# Altium PCB hub_usb.PcbDoc (part 2 of 2)
Units mm, origin at the board's own origin, x right, y up, seen from the top; angles counter-clockwise.
Board outline 68.09 x 80.66 mm, 4 copper layers (Top Layer 1, Top Layer, Bottom Layer, Bottom Layer 1), stack 0.603 mm thick; 101 components, 78 nets, 533 pads, 44 vias.
Unrouted connection lines stored in the file: 1.
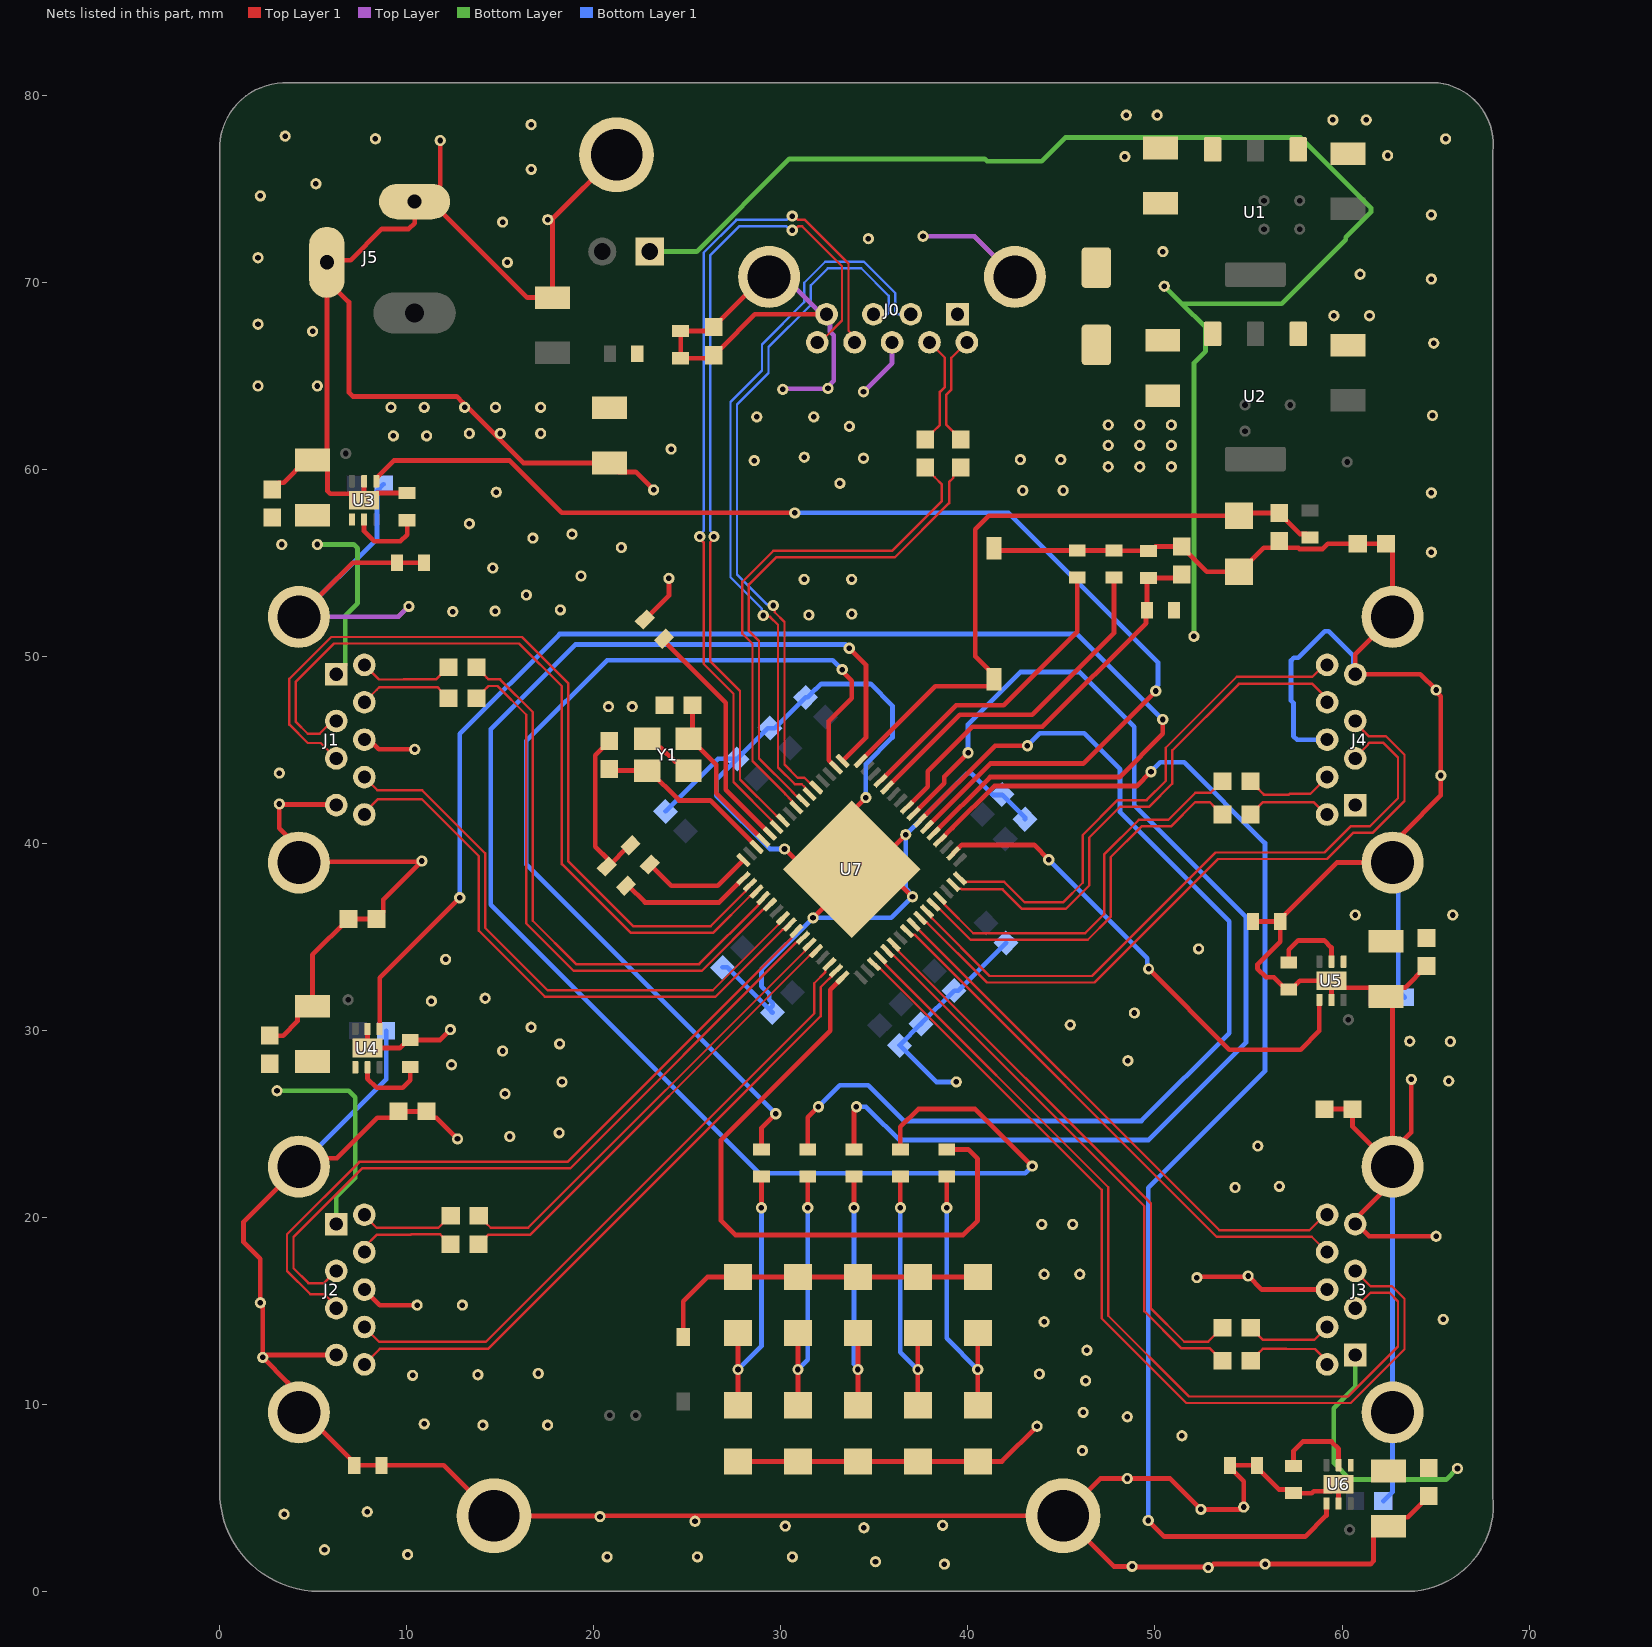
[diagram p4: the nets of this part, all layers, seen from the top]

## Via types
v1: diameter 0.6, hole 0.3, Top Layer 1 to Bottom Layer 1, tented both sides, 44 vias

## Nets (pads, with @x,y where several pads share a name; then routed paths per layer and width w, separated by ;. In a path a pad name is that pad's centre, name@x,y a point inside that pad or via, vN(x,y) a via of type N, cw(c..) or ccw(c..) an arc to the next point about the centre after c; other vN are vias at no path point) (continued)
GND: C1.1 C1.2 C2.1 C3.1 C4.1 C5.1 C6.1 C7.1 C8.1 C9.1 C10.1 C11.1 C12.1 C13.1 C14.2 C15.2 C16.2 C17.2 C18.1 C19.1 C20.1 C21.1 C22.1 C23.1 C24.1 C25.1 C26.1 C27.1 C28.1 C29.1 C30.1 C31.1 C32.1 C35.1 C36.1 C37.1 C42.1 C42.2 C43.1 C43.2 C48.1 C48.2 C49.1 C49.2 D8.1 D9.1 D10.1 D11.1 D12.1 J0.4 J0.7 J0.SH1 J0.SH2 J1.4 J1.7 J1.SH1 J1.SH2 J2.4 J2.7 J2.SH1 J2.SH2 J3.4 J3.7 J3.SH1 J3.SH2 J4.4 J4.7 J4.SH1 J4.SH2 J5.2 J5.3 pad.3@2.038,64.444 pad.3@2.038,67.746 pad.3@2.038,71.302 pad.3@2.165,15.422 pad.3@2.165,74.604 pad.3@2.292,12.501 pad.3@3.181,42.092 pad.3@3.181,43.743 pad.3@3.435,4.119 pad.3@3.493,77.801 pad.3@4.959,67.365 pad.3@5.136,75.255 pad.3@5.213,64.444 pad.3@5.594,2.214 pad.3@7.88,4.246 pad.3@8.316,77.66 pad.3@9.15,63.301 pad.3@9.277,61.777 pad.3@10.039,1.96 pad.3@10.42,45.013 pad.3@10.106,52.655 pad.3@10.307,11.54 pad.3@10.547,15.295 pad.3@10.801,39.044 pad.3@10.928,8.945 pad.3@10.928,63.301 pad.3@11.055,61.777 pad.3@11.309,31.551 pad.3@11.781,77.567 pad.3@12.072,33.781 pad.3@12.325,30.027 pad.3@12.385,28.147 pad.3@12.452,52.379 pad.3@12.706,24.185 pad.3@12.967,15.298 pad.3@13.087,63.301 pad.3@13.341,57.078 pad.3@13.341,61.904 pad.3@13.799,11.574 pad.3@14.065,8.88 pad.3@14.78,58.762 pad.3@14.185,31.707 pad.3@14.593,54.712 pad.3@14.718,52.406 pad.3@14.738,63.301 pad.3@14.992,61.904 pad.3@15.5,24.312 pad.3@15.119,28.884 pad.3@15.119,73.207 pad.3@15.246,26.598 pad.3@15.373,71.048 pad.3@16.389,53.268 pad.3@16.643,30.154 pad.3@16.643,78.414 pad.3@16.651,76.021 pad.3@16.736,56.311 pad.3@17.024,11.64 pad.3@17.151,61.904 pad.3@17.151,63.301 pad.3@17.523,8.88 pad.3@17.532,73.334 pad.3@18.83,56.519 pad.3@18.137,24.508 pad.3@18.167,29.265 pad.3@18.207,52.469 pad.3@18.294,27.233 pad.3@19.31,54.284 pad.3@20.326,3.992 pad.3@20.707,1.833 pad.3@20.779,47.299 pad.3@21.469,55.808 pad.3@22.049,47.299 pad.3@23.192,58.887 pad.3@24.009,54.157 pad.3@24.127,61.068 pad.3@25.406,3.738 pad.3@25.533,1.833 pad.3@28.575,60.452 pad.3@28.708,62.793 pad.3@30.099,64.262 pad.3@30.193,39.687 pad.3@30.232,3.484 pad.3@30.613,1.833 pad.3@31.242,54.102 pad.3@31.248,60.634 pad.3@31.496,52.197 pad.3@31.717,36.004 pad.3@31.756,62.793 pad.3@32.518,64.317 pad.3@33.153,59.237 pad.3@33.661,62.285 pad.3@33.782,54.102 pad.3@33.788,52.252 pad.3@34.54,42.436 pad.3@34.417,60.579 pad.3@34.417,64.135 pad.3@34.435,3.392 pad.3@34.677,72.318 pad.3@35.058,1.579 pad.3@36.67,40.449 pad.3@37.032,37.132 pad.3@37.598,72.445 pad.3@38.647,3.522 pad.3@38.741,1.452 pad.3@39.376,27.233 pad.3@42.805,60.507 pad.3@42.932,58.856 pad.3@43.694,8.818 pad.3@43.821,11.612 pad.3@43.948,19.613 pad.3@44.075,14.406 pad.3@44.075,16.946 pad.3@44.964,60.507 pad.3@45.091,58.856 pad.3@45.98,16.946 pad.3@45.472,30.281 pad.3@45.599,19.613 pad.3@46.117,7.518 pad.3@46.161,9.559 pad.3@46.291,11.253 pad.3@46.361,12.882 pad.3@47.498,60.126 pad.3@47.498,61.269 pad.3@47.498,62.357 pad.3@48.52,6.024 pad.3@48.52,9.326 pad.3@48.387,76.708 pad.3@48.465,78.922 pad.3@48.549,28.364 pad.3@48.774,1.325 pad.3@48.901,30.916 pad.3@49.188,60.126 pad.3@49.188,61.269 pad.3@49.188,62.357 pad.3@50.116,78.922 pad.3@50.878,60.126 pad.3@50.878,61.269 pad.3@50.878,62.357 pad.3@51.441,8.31 pad.3@52.33,34.345 pad.3@52.241,16.769 pad.3@52.457,4.373 pad.3@52.849,1.264 pad.3@54.282,21.589 pad.3@54.743,4.5 pad.3@54.977,16.855 pad.3@55.498,23.804 pad.3@55.886,1.452 pad.3@56.648,21.645 pad.3@59.514,78.668 pad.3@59.563,68.199 pad.3@60.966,70.413 pad.3@61.292,78.668 pad.3@61.468,68.199 pad.3@62.435,76.763 pad.3@63.619,29.407 pad.3@63.706,27.365 pad.3@64.776,55.554 pad.3@64.776,58.729 pad.3@64.776,70.159 pad.3@64.776,73.588 pad.3@64.837,62.863 pad.3@64.903,66.73 pad.3@65.03,18.978 pad.3@65.03,48.188 pad.3@65.284,43.616 pad.3@65.411,14.533 pad.3@65.538,77.652 pad.3@65.704,27.279 pad.3@65.792,29.392 pad.19 PWR.1 R1.1 R1.2 R2.1 R3.1 R5.1 R6.1 R8.2 R10.1 R11.1 R12.1 R13.1 R14.1 R20.1 R20.2 R21.1 R21.2 R22.1 R22.2 R23.1 R23.2 RESET.2 U1.1 U2.1 U3.5 U3.7 U4.5 U4.7 U5.5 U5.7 U6.5 U6.7 U7.65 Y1.2 Y1.4 | length 564.7
  Top Layer 1 w0.254: C20.1@2.667,29.706 3.384,29.706 4.15,30.472 4.15,30.797 4.628,31.275 C26.1@4.953,31.275 4.953,34.027 6.867,35.941 C42.1@6.882,35.941 C42.2@8.382,35.941 8.397,35.941 8.74,36.284 8.74,36.983 pad.3@10.759,39.002 ; C19.1@2.794,58.916 2.794,58.931 3.137,59.274 3.417,59.274 4.628,60.485 C25.1@4.953,60.485 C25.1@5.246,60.485 ; J1.SH1@4.223,52.1 7.114,54.991 R20.1@9.472,54.991 R20.2@10.922,54.991 ; J5.3@5.724,71.054 J5.3@5.724,70.104 ; J2.4@6.223,12.629 2.513,12.629 2.386,12.501 pad.3@2.292,12.501 ; J1.4@6.223,42.03 6.192,42.061 3.212,42.061 pad.3@3.181,42.092 3.181,40.802 4.223,39.759 J1.SH2@4.223,38.96 4.265,39.002 pad.3@10.759,39.002 ; J5.3@6.484,71.167 6.989,71.167 8.659,72.837 10.099,72.837 10.414,73.152 J5.2@10.414,74.304 J5.2@10.919,74.304 ; U3.5@7.713,59.352 U3.7@7.713,58.327 ; J2.7@7.723,16.129 8.557,15.295 pad.3@10.547,15.295 ; J1.7@7.723,45.53 7.981,45.53 8.498,45.013 pad.3@10.42,45.013 ; U4.5@7.893,30.065 U4.7@7.893,29.04 9.62,29.04 10.054,29.474 R3.1@10.179,29.474 11.772,29.474 pad.3@12.325,30.027 ; R2.1@10.014,58.717 8.403,58.717 8.013,58.327 U3.7@7.713,58.327 ; pad.3@10.801,39.044 pad.3@10.759,39.002 ; pad.3@11.781,77.567 11.781,75.166 J5.2@10.919,74.304 ; pad.3@12.706,24.185 11.58,25.311 11.392,25.311 C43.2@11.049,25.654 C43.1@9.549,25.654 9.206,25.311 8.427,25.311 6.262,23.146 4.67,23.146 J2.SH1@4.223,22.699 1.27,19.746 1.27,18.669 2.165,17.774 pad.3@2.165,15.422 2.165,15.329 2.292,15.202 pad.3@2.292,12.501 ; pad.3@20.326,3.992 20.306,4.013 14.678,4.013 pad.19@14.658,4.033 ; C36.1@20.828,45.454 20.828,45.439 20.077,44.688 20.077,39.816 20.78,39.113 20.78,38.833 R14.1@20.692,38.744 20.755,38.744 21.898,39.887 R10.1@21.962,39.887 ; pad.19@21.213,76.804 17.78,73.371 C18.1@17.78,69.168 16.432,69.168 11.296,74.304 J5.2@10.919,74.304 ; R11.1@22.724,51.952 24.009,53.238 pad.3@24.009,54.157 ; Y1.4@22.857,45.578 23.33,45.105 23.582,45.105 24.336,44.351 24.584,44.351 Y1.2@25.057,43.878 ; pad.3@23.192,58.887 22.232,59.847 21.306,59.847 C31.1@20.828,60.325 16.227,60.325 13.169,63.383 13.099,63.383 13.021,63.461 13.021,63.532 12.67,63.882 7.111,63.882 6.898,64.095 6.898,68.929 J5.3@5.724,70.104 ; D8.1@27.701,6.942 D9.1@30.908,6.942 D10.1@34.115,6.942 D11.1@37.322,6.942 D12.1@40.528,6.942 41.818,6.942 pad.3@43.694,8.818 ; J0.SH2@29.371,70.278 29.092,70.278 26.416,67.602 C1.1@26.416,67.587 26.206,67.377 R1.2@24.638,67.377 R1.1@24.638,65.927 26.256,65.927 C1.2@26.416,66.087 26.416,66.102 26.759,66.445 26.774,66.445 28.607,68.278 J0.4@32.441,68.278 ; pad.3@30.193,39.687 31.272,38.608 U7.65@33.782,38.608 ; pad.3@31.717,36.004 33.782,38.069 U7.65@33.782,38.608 ; pad.3@34.54,42.436 33.782,41.678 U7.65@33.782,38.608 ; pad.3@36.67,40.449 U7.65@34.829,38.608 ; pad.3@37.032,37.132 35.556,38.608 U7.65@34.829,38.608 ; RESET.2@41.402,55.768 41.524,55.646 R13.1@45.847,55.646 R12.1@47.805,55.646 47.815,55.636 49.647,55.636 R8.2@49.657,55.626 49.782,55.626 50.012,55.856 C32.1@51.435,55.856 51.435,55.841 52.769,54.507 PWR.1@54.483,54.507 54.533,54.507 55.814,55.788 56.299,55.788 C35.1@56.642,56.131 ; pad.3@52.241,16.769 52.284,16.812 54.934,16.812 pad.3@54.977,16.855 55.703,16.129 J3.7@59.206,16.129 ; R23.2@55.245,35.814 R23.1@56.695,35.814 ; C35.1@56.642,56.146 C35.1@56.642,56.131 ; C48.2@59.067,25.781 C48.1@60.567,25.781 60.567,24.838 J3.SH2@62.706,22.699 ; U5.5@59.436,31.614 U5.7@59.436,32.639 ; U6.5@59.817,4.69 U6.7@59.817,5.715 59.444,5.342 58.485,5.342 58.386,5.244 R6.1@57.404,5.244 57.206,5.442 56.626,5.442 55.462,6.606 R22.1@55.462,6.731 R22.2@54.012,6.731 54.012,6.606 54.743,5.875 pad.3@54.743,4.5 54.649,4.5 54.522,4.373 pad.3@52.457,4.373 50.806,6.024 pad.3@48.52,6.024 47.081,6.024 pad.19@45.089,4.033 ; pad.3@63.706,27.365 63.706,24.528 J3.SH2@62.706,23.528 ; C22.1@64.516,33.425 64.516,33.41 63.381,32.275 62.835,32.275 C28.1@62.357,31.797 ; C21.1@64.643,5.092 64.643,5.077 63.52,3.954 62.962,3.954 C27.1@62.484,3.476 62.159,3.476 61.681,2.998 61.681,1.601 61.532,1.452 53.131,1.452 52.943,1.264 pad.3@52.849,1.264 52.818,1.295 48.805,1.295 pad.3@48.774,1.325 47.797,1.325 pad.19@45.089,4.033 ; pad.3@65.03,18.978 61.448,18.978 60.798,19.629 J3.4@60.706,19.629 60.706,19.887 62.706,21.887 J3.SH2@62.706,22.699 ; pad.3@2.292,12.501 3.637,11.156 3.637,10.145 J2.SH2@4.223,9.559 4.483,9.559 7.186,6.856 R21.1@7.186,6.731 R21.2@8.636,6.731 11.959,6.731 pad.19@14.658,4.033 ; C25.1@5.246,60.485 5.278,60.485 5.756,60.007 5.756,58.823 5.905,58.674 7.366,58.674 U3.7@7.713,58.327 ; C25.1@5.246,60.485 5.724,60.963 J5.3@5.724,70.104 ; pad.19@14.658,4.033 pad.19@45.089,4.033 ; U7.65@33.782,38.608 U7.65@34.829,38.608 ; C35.1@56.642,56.131 56.985,55.788 57.668,55.788 57.727,55.729 58.968,55.729 59.246,56.007 C49.2@60.845,56.007 C49.1@62.345,56.007 62.36,56.007 62.703,55.664 62.703,52.103 J4.SH2@62.706,52.1 60.706,50.1 J4.4@60.706,49.03 64.188,49.03 pad.3@65.03,48.188 65.03,48.095 65.284,47.841 pad.3@65.284,43.616 65.284,42.551 63.292,40.559 63.292,39.546 J4.SH1@62.706,38.96 59.716,38.96 56.695,35.939 R23.1@56.695,35.814 ; R23.1@56.695,35.814 56.695,34.724 55.477,33.506 55.477,33.296 55.942,32.831 56.362,32.831 57.025,32.168 R5.1@57.15,32.168 57.275,32.168 57.746,32.639 U5.7@59.436,32.639 ; U5.7@59.436,32.639 59.809,32.266 61.888,32.266 C28.1@62.357,31.797 ; C28.1@62.357,31.797 62.706,31.448 J3.SH2@62.706,23.528 ; J3.SH2@62.706,22.699 J3.SH2@62.706,23.528
  Top Layer w0.254: J1.SH1@4.223,52.1 9.551,52.1 pad.3@10.106,52.655 ; J0.SH2@29.371,70.278 30.183,70.278 32.183,68.278 J0.4@32.441,68.278 32.624,68.095 32.624,67.347 32.826,67.145 32.826,64.719 32.518,64.411 pad.3@32.518,64.317 32.49,64.29 30.127,64.29 pad.3@30.099,64.262 ; pad.3@34.417,64.135 35.941,65.659 J0.7@35.941,66.778 ; pad.3@37.598,72.445 40.344,72.445 42.672,70.117 J0.SH1@42.672,69.723
  Bottom Layer 1 w0.254: J2.SH1@4.223,22.699 8.89,27.366 C24.1@8.89,29.972 ; J1.SH1@4.223,52.1 8.405,56.282 8.405,58.839 8.748,59.182 C29.1@8.763,59.182 ; C6.1@23.831,41.701 26.636,44.505 27.631,44.505 C15.2@27.641,44.495 ; C12.1@26.879,33.356 27.133,33.356 C13.1@29.373,31.116 ; C13.1@29.546,30.943 C13.1@29.373,31.116 ; pad.3@30.193,39.687 29.401,39.687 26.543,42.545 26.543,43.396 C15.2@27.641,44.495 ; pad.3@34.54,42.436 34.54,44.228 35.963,45.651 35.963,47.349 34.798,48.514 32.162,48.514 31.893,48.245 31.869,48.245 31.421,47.797 C16.2@31.324,47.797 29.673,46.146 C9.1@29.419,46.146 29.292,46.146 C15.2@27.641,44.495 ; pad.3@39.376,27.233 38.299,27.233 C10.1@36.344,29.188 C7.1@37.487,30.331 C17.2@39.265,32.109 39.475,32.109 C14.2@42.037,34.671 ; C8.1@43.053,41.275 43.053,41.364 C11.1@41.828,42.59 41.817,42.579 41.332,42.579 40.171,43.74 39.961,43.74 pad.3@36.67,40.449 36.67,37.588 37.032,37.226 pad.3@37.032,37.132 35.904,36.004 pad.3@31.717,36.004 28.956,33.243 28.956,32.354 29.373,31.937 29.373,31.622 29.557,31.439 29.557,31.3 C13.1@29.373,31.116 ; J4.7@59.206,45.53 57.594,45.53 57.404,45.72 57.404,47.498 57.277,47.625 57.277,49.762 57.426,49.911 57.658,49.911 59.077,51.33 59.287,51.33 60.602,50.015 60.602,49.134 J4.4@60.706,49.03 ; C30.1@62.206,4.826 62.221,4.826 62.706,5.311 J3.SH1@62.706,9.559 J3.SH2@62.706,22.699 ; J4.SH1@62.706,38.96 63.003,38.663 63.003,32.093 63.346,31.75 C23.1@63.361,31.75
NetC32_2: C32.2 R7.2 R8.1 U7.41 | length 21.7
  Top Layer 1 w0.254: U7.41@36.741,41.921 37.846,43.026 37.846,43.842 40.232,46.228 43.98,46.228 49.521,51.769 49.521,52.405 R7.2@49.567,52.451 49.567,54.086 R8.1@49.657,54.176 51.255,54.176 C32.2@51.435,54.356
NetC35_2: C35.2 PWR.2 R9.2 RESET.1 U7.48 | length 36.3
  Top Layer 1 w0.254: U7.48@34.266,44.396 38.258,48.387 41.129,48.387 41.402,48.66 RESET.1@41.402,48.768 41.402,48.968 40.386,49.984 40.386,56.769 41.124,57.507 PWR.2@54.483,57.507 ; PWR.2@54.483,57.785 54.622,57.646 C35.2@56.642,57.646 56.642,57.631 56.985,57.288 57.74,56.533 58.095,56.533 R9.2@58.293,56.335
NetC36_2: C36.2 U7.62 Y1.1 | length 9.6
  Top Layer 1 w0.254: C36.2@20.828,43.954 20.904,43.878 Y1.1@22.857,43.878 22.957,43.878 24.555,42.28 26.221,42.28 U7.62@28.701,39.799
NetC37_2: C37.2 U7.61 Y1.3 | length 9
  Top Layer 1 w0.254: C37.2@25.273,47.371 25.273,45.795 Y1.3@25.057,45.578 25.157,45.578 26.537,44.198 26.537,42.671 U7.61@29.055,40.153
NetD2_C: D2.C D3.2 D4.2 D5.2 D6.2 D7.2 | length 18.2
  Top Layer 1 w0.254: D2.C@24.78,13.591 24.78,15.509 26.071,16.8 D3.2@27.701,16.8 D4.2@30.908,16.8 D5.2@34.115,16.8 D6.2@37.322,16.8 D7.2@40.528,16.8
NetD3_1: D3.1 D8.2 R15.1 | length 14.7
  Top Layer 1 w0.254: D8.2@27.701,9.942 v1(27.701,11.854) D3.1@27.701,13.8 ; v1(28.956,20.5) R15.1@28.956,22.172
  Bottom Layer 1 w0.254: v1(27.701,11.854) 28.956,13.108 v1(28.956,20.5)
NetD4_1: D4.1 D9.2 R16.1 | length 14.4
  Top Layer 1 w0.254: D9.2@30.908,9.942 v1(30.908,11.854) D4.1@30.908,13.8 ; v1(31.432,20.5) R16.1@31.432,22.172
  Bottom Layer 1 w0.254: v1(30.908,11.854) 31.432,12.378 v1(31.432,20.5)
NetD5_1: D5.1 D10.2 R17.1 | length 14.3
  Top Layer 1 w0.254: v1(33.909,20.5) R17.1@33.909,22.172 ; D10.2@34.115,9.942 v1(34.115,11.854) D5.1@34.115,13.8
  Bottom Layer 1 w0.254: v1(33.909,20.5) 33.909,12.154 34.115,11.948 v1(34.115,11.854)
NetD6_1: D6.1 D11.2 R18.1 | length 14.6
  Top Layer 1 w0.254: v1(36.386,20.5) R18.1@36.386,22.172 ; D11.2@37.322,9.942 v1(37.322,11.854) D6.1@37.322,13.8
  Bottom Layer 1 w0.254: v1(36.386,20.5) 36.386,12.79 v1(37.322,11.854)
NetD7_1: D7.1 D12.2 R19.1 | length 14.9
  Top Layer 1 w0.254: v1(38.862,20.5) R19.1@38.862,22.172 ; D12.2@40.528,9.942 v1(40.528,11.854) D7.1@40.528,13.8
  Bottom Layer 1 w0.254: v1(38.862,20.5) 38.862,13.52 v1(40.528,11.854)
NetR2_2: R2.2 U3.2 | length 4.1
  Top Layer 1 w0.254: U3.2@7.713,57.302 7.713,56.676 8.255,56.134 9.652,56.134 10.014,56.496 R2.2@10.014,57.267
NetR3_2: R3.2 U4.2 | length 4
  Top Layer 1 w0.254: U4.2@7.893,28.015 7.893,27.413 8.382,26.924 9.779,26.924 10.179,27.324 R3.2@10.179,28.024
NetR5_2: R5.2 U5.2 | length 4.1
  Top Layer 1 w0.254: R5.2@57.15,33.618 57.15,34.29 57.658,34.798 59.055,34.798 59.436,34.417 U5.2@59.436,33.664
NetR6_2: R6.2 U6.2 | length 4.5
  Top Layer 1 w0.254: R6.2@57.404,6.694 57.404,7.493 57.912,8.001 59.436,8.001 59.817,7.62 U6.2@59.817,6.74
NetR10_2: R10.2 U7.64 | length 6
  Top Layer 1 w0.254: R10.2@22.987,38.862 24.13,37.719 26.621,37.719 U7.64@27.994,39.092
NetR11_2: R11.2 U7.60 | length 12.8
  Top Layer 1 w0.254: R11.2@23.749,50.927 23.749,50.8 27.051,47.498 27.051,42.864 U7.60@29.409,40.507
NetR12_2: R12.2 U7.44 | length 18.5
  Top Layer 1 w0.254: U7.44@35.681,42.981 39.562,46.863 43.434,46.863 47.805,51.234 R12.2@47.805,54.196
NetR13_2: R13.2 U7.45 | length 16.7
  Top Layer 1 w0.254: U7.45@35.327,43.335 39.363,47.371 41.91,47.371 45.847,51.308 R13.2@45.847,54.196
NetR14_2: R14.2 U7.1 | length 7.2
  Top Layer 1 w0.254: R14.2@21.717,37.719 21.844,37.719 22.733,36.83 26.701,36.83 U7.1@27.994,38.124
NetR15_2: R15.2 U7.50 | length 52.7
  Top Layer 1 w0.254: R15.2@28.956,23.622 28.956,24.765 v1(29.718,25.527) ; U7.50@32.944,44.042 32.944,44.046 32.557,44.434 32.557,46.527 33.782,47.752 33.782,48.674 33.274,49.182 v1(33.274,49.276)
  Bottom Layer 1 w0.254: v1(29.718,25.527) 16.383,38.862 16.383,45.466 20.701,49.784 32.766,49.784 v1(33.274,49.276)
NetR16_2: R16.2 U7.39 | length 57.6
  Top Layer 1 w0.254: R16.2@31.432,23.622 31.432,25.336 v1(32.004,25.908) ; U7.39@37.448,41.214 41.447,45.212 v1(43.18,45.212)
  Bottom Layer 1 w0.254: v1(32.004,25.908) 33.147,27.051 34.671,27.051 36.576,25.146 49.276,25.146 53.975,29.845 53.975,35.814 48.133,41.656 48.133,43.942 46.206,45.869 43.837,45.869 v1(43.18,45.212)
NetR17_2: R17.2 U7.40 | length 62.7
  Top Layer 1 w0.254: R17.2@33.909,23.622 33.909,25.687 34.036,25.814 v1(34.036,25.908) ; U7.40@37.095,41.567 37.095,41.571 38.735,43.212 38.735,43.561 v1(40.005,44.831)
  Bottom Layer 1 w0.254: v1(34.036,25.908) 34.544,25.908 34.787,25.665 36.322,24.13 49.657,24.13 54.864,29.337 54.864,36.068 48.895,42.037 48.895,46.228 45.974,49.149 42.799,49.149 40.005,46.355 v1(40.005,44.831)
NetR18_2: R18.2 U7.49 | length 82.4
  Top Layer 1 w0.254: U7.49@33.298,44.396 34.544,45.642 34.544,49.53 v1(33.655,50.419) ; R18.2@36.386,23.622 36.386,24.828 37.338,25.781 40.386,25.781 v1(43.434,22.733)
  Bottom Layer 1 w0.254: v1(33.655,50.419) 33.455,50.619 18.996,50.619 14.478,46.101 14.478,36.703 28.829,22.352 43.053,22.352 v1(43.434,22.733)
NetR19_2: R19.2 U7.16 | length 35.2
  Top Layer 1 w0.254: U7.16@33.298,32.82 32.639,32.162 32.639,29.972 26.797,24.13 26.797,19.812 27.559,19.05 39.751,19.05 40.513,19.812 40.513,23.114 40.005,23.622 R19.2@38.862,23.622
NetU3_4: U3.4 U7.38 | length 63.7
  Top Layer 1 w0.254: U3.4@8.363,59.352 8.363,59.522 9.293,60.452 15.494,60.452 18.288,57.658 v1(30.734,57.658) ; U7.38@37.802,40.86 41.199,44.257 46.162,44.257 v1(50.038,48.133)
  Bottom Layer 1 w0.254: v1(30.734,57.658) 42.164,57.658 50.165,49.657 50.165,48.455 50.104,48.394 50.104,48.199 v1(50.038,48.133)
NetU4_4: U4.4 U7.37 | length 74.5
  Top Layer 1 w0.254: U4.4@8.543,30.065 8.543,32.8 v1(12.827,37.084) ; U7.37@38.155,40.507 41.182,43.533 46.417,43.533 48.105,43.533 50.419,45.847 v1(50.419,46.609)
  Bottom Layer 1 w0.254: v1(12.827,37.084) 12.827,45.847 18.161,51.181 45.847,51.181 v1(50.419,46.609)
NetU5_4: U5.4 U7.34 | length 26.7
  Top Layer 1 w0.254: U7.34@39.216,39.446 39.22,39.446 39.679,39.905 43.534,39.905 v1(44.323,39.116) ; v1(49.657,33.274) 53.975,28.956 57.785,28.956 58.786,29.957 U5.4@58.786,31.614
  Bottom Layer 1 w0.254: v1(44.323,39.116) 49.591,33.848 49.591,33.34 v1(49.657,33.274)
NetU6_4: U6.4 U7.36 | length 70.7
  Top Layer 1 w0.254: U7.36@38.509,40.153 39.17,40.814 39.17,40.822 41.401,43.053 49.022,43.053 v1(49.784,43.815) ; v1(49.64,3.781) 50.5,2.921 58.039,2.921 59.167,4.049 U6.4@59.167,4.69
  Bottom Layer 1 w0.254: v1(49.64,3.781) 49.64,21.573 55.88,27.813 55.88,40.005 51.562,44.323 50.292,44.323 v1(49.784,43.815)
P1_D_N: J1.2 U7.3 | length 43.2
  Top Layer 1 w0.128: J1.2@6.223,46.53 6.017,46.53 5.334,45.847 4.699,45.847 4.064,46.482 4.064,48.641 6.096,50.673 16.002,50.673 18.288,48.387 18.288,38.878 21.954,35.212 26.389,35.212 28.336,37.158 28.35,37.158 28.608,37.417 U7.3@28.701,37.417
P1_D_P: J1.3 U7.2 | length 44.2
  Top Layer 1 w0.128: J1.3@6.223,44.53 5.397,45.356 4.698,45.356 3.716,46.338 3.716,48.785 5.952,51.021 16.146,51.021 18.636,48.531 18.636,39.022 22.098,35.56 26.245,35.56 28.09,37.405 28.09,37.419 28.348,37.677 U7.2@28.348,37.77
P1_RX_N: J1.5 U7.8 | length 31.5
  Top Layer 1 w0.128: J1.5@7.723,41.53 7.723,41.632 8.447,42.356 10.795,42.356 13.843,39.308 13.843,35.322 17.382,31.783 26.496,31.783 30.104,35.391 30.118,35.391 30.376,35.649 U7.8@30.469,35.649
P1_RX_P: J1.6 U7.7 | length 31.1
  Top Layer 1 w0.128: J1.6@7.723,43.53 8.422,42.831 10.812,42.831 14.191,39.452 14.191,35.466 17.526,32.131 26.352,32.131 29.858,35.637 29.858,35.651 30.116,35.909 U7.7@30.116,36.002
P1_TX1_N: C38.2 J1.8 | length 5.1
  Top Layer 1 w0.128: J1.8@7.723,47.53 8.389,48.196 8.533,48.34 11.628,48.34 11.795,48.173 11.795,48.158 12.201,47.752 C38.2@12.216,47.752
P1_TX1_P: C40.2 J1.9 | length 5.1
  Top Layer 1 w0.128: J1.9@7.723,49.53 8.502,48.751 9.818,48.751 ; 9.819,48.752 11.565,48.752 11.795,48.982 11.795,48.997 12.201,49.403 C40.2@12.216,49.403
P1_TX_N: C38.1 U7.5 | length 30.3
  Top Layer 1 w0.128: C38.1@13.716,47.752 13.731,47.752 14.137,48.158 14.137,48.173 14.261,48.297 14.367,48.403 14.843,48.403 16.383,46.863 16.383,35.703 18.906,33.18 25.772,33.18 29.043,36.451 29.057,36.451 29.315,36.709 U7.5@29.409,36.709
P1_TX_P: C40.1 U7.4 | length 30
  Top Layer 1 w0.128: C40.1@13.716,49.403 13.731,49.403 14.137,48.997 14.137,48.982 14.272,48.847 14.367,48.752 14.987,48.752 16.731,47.007 16.731,35.847 19.05,33.528 25.627,33.528 28.797,36.697 28.797,36.712 29.055,36.97 U7.4@29.055,37.063
P2_D_N: J2.2 U7.10 | length 38.4
  Top Layer 1 w0.128: J2.2@6.223,17.129 5.571,16.477 4.732,16.477 3.937,17.272 3.937,18.939 7.604,22.606 18.733,22.606 30.811,34.684 30.825,34.684 31.083,34.942 U7.10@31.176,34.942
P2_D_P: J2.3 U7.9 | length 39.5
  Top Layer 1 w0.128: J2.3@6.223,15.129 6.223,15.24 5.588,15.875 4.842,15.875 3.589,17.128 3.589,19.083 7.46,22.954 18.589,22.954 30.565,34.93 30.565,34.944 30.823,35.202 U7.9@30.823,35.295
P2_RX_N: J2.5 U7.15 | length 34.9
  Top Layer 1 w0.128: J2.5@7.723,12.129 8.549,12.955 14.336,12.955 26.47,25.089 32.131,30.75 32.131,32.304 32.944,33.117 U7.15@32.944,33.174
P2_RX_P: J2.6 U7.14 | length 34.6
  Top Layer 1 w0.128: J2.6@7.723,14.129 8.521,13.331 14.22,13.331 26.122,25.233 31.783,30.894 31.783,32.505 32.378,33.1 32.378,33.315 U7.14@32.591,33.527
P2_TX1_N: C39.2 J2.8 | length 5.4
  Top Layer 1 w0.128: J2.8@7.723,18.129 7.723,18.391 8.382,19.05 10.207,19.05 10.24,19.083 11.778,19.083 11.91,18.951 11.91,18.948 12.316,18.542 C39.2@12.331,18.542
P2_TX1_P: C41.2 J2.9 | length 5.2
  Top Layer 1 w0.128: J2.9@7.723,20.129 7.723,20.09 8.382,19.431 11.693,19.431 12.328,20.066 C41.2@12.343,20.066
P2_TX_N: C39.1 U7.12 | length 24.6
  Top Layer 1 w0.128: C39.1@13.831,18.542 13.846,18.542 14.252,18.948 14.252,18.963 14.339,19.05 16.591,19.05 31.518,33.976 31.532,33.976 31.79,34.235 U7.12@31.883,34.235
P2_TX_P: C41.1 U7.11 | length 24.3
  Top Layer 1 w0.128: C41.1@13.843,20.066 13.858,20.066 14.264,19.66 14.264,19.65 14.483,19.431 16.48,19.431 31.272,34.223 31.272,34.237 31.53,34.495 U7.11@31.53,34.588
P3_D_N: J3.2 U7.20 | length 47.8
  Top Layer 1 w0.128: U7.20@35.327,33.881 35.327,33.788 35.585,33.53 35.585,33.515 47.498,21.603 47.498,14.732 51.816,10.414 60.325,10.414 62.992,13.081 62.992,15.494 62.531,15.955 61.532,15.955 J3.2@60.706,15.129
P3_D_P: J3.3 U7.19 | length 49.3
  Top Layer 1 w0.128: U7.19@34.973,33.527 35.067,33.527 35.325,33.269 35.339,33.269 47.15,21.458 47.15,14.588 51.672,10.066 60.469,10.066 63.34,12.937 63.34,15.638 62.675,16.303 61.532,16.303 J3.3@60.706,17.129
P3_RX_N: J3.5 U7.25 | length 29.2
  Top Layer 1 w0.128: U7.25@37.095,35.649 53.441,19.303 58.253,19.303 59.079,20.129 J3.5@59.206,20.129
P3_RX_P: J3.6 U7.24 | length 29.6
  Top Layer 1 w0.128: U7.24@36.741,35.295 36.953,35.083 37.047,35.083 37.054,35.091 37.16,35.091 53.296,18.955 58.38,18.955 J3.6@59.206,18.129
P3_TX1_N: C44.2 J3.8 | length 4.7
  Top Layer 1 w0.128: C44.2@55.118,14.097 55.133,14.097 55.539,13.691 55.539,13.676 55.775,13.44 58.517,13.44 J3.8@59.206,14.129
P3_TX1_P: C46.2 J3.9 | length 4.8
  Top Layer 1 w0.128: C46.2@55.118,12.319 55.133,12.319 55.539,12.725 55.539,12.74 55.766,12.967 57.015,12.967 57.028,12.954 58.547,12.954 59.206,12.295 J3.9@59.206,12.129
P3_TX_N: C44.1 U7.22 | length 30.1
  Top Layer 1 w0.128: U7.22@36.034,34.588 36.034,34.495 36.292,34.237 36.292,34.223 49.784,20.731 49.784,15.113 51.562,13.335 52.841,13.335 53.603,14.097 C44.1@53.618,14.097
P3_TX_P: C46.1 U7.21 | length 30.3
  Top Layer 1 w0.128: U7.21@35.681,34.235 35.774,34.235 36.032,33.976 36.046,33.976 49.436,20.587 49.436,14.969 51.418,12.987 52.935,12.987 53.603,12.319 C46.1@53.618,12.319
P4_D_N: J4.2 U7.27 | length 35.8
  Top Layer 1 w0.128: U7.27@37.802,36.356 37.802,36.263 38.06,36.004 38.06,35.99 41.157,32.893 46.625,32.893 48.801,35.069 53.229,39.497 59.055,39.497 60.452,40.894 61.484,40.894 62.992,42.402 62.992,44.577 62.197,45.372 61.465,45.372 61.39,45.297 61.39,45.261 60.706,44.577 J4.2@60.706,44.53
P4_D_P: J4.3 U7.26 | length 37.2
  Top Layer 1 w0.128: U7.26@37.448,36.002 37.542,36.002 37.8,35.744 37.814,35.744 41.013,32.545 46.769,32.545 49.149,34.925 53.373,39.149 59.199,39.149 60.596,40.546 61.628,40.546 63.34,42.258 63.34,44.721 62.341,45.72 61.424,45.72 60.706,46.438 J4.3@60.706,46.53
P4_RX_N: J4.5 U7.32 | length 28
  Top Layer 1 w0.128: U7.32@39.57,38.124 39.782,37.912 39.875,37.912 39.898,37.934 41.933,37.934 43.037,36.83 45.085,36.83 46.134,37.879 46.134,40.436 47.997,42.3 49.554,42.3 50.579,43.324 50.579,45.102 54.372,48.895 58.42,48.895 59.055,49.53 J4.5@59.206,49.53
P4_RX_P: J4.6 U7.31 | length 28.6
  Top Layer 1 w0.128: U7.31@39.216,37.77 39.428,37.558 39.643,37.558 39.678,37.523 41.852,37.523 42.893,36.482 45.229,36.482 46.482,37.735 46.482,40.292 48.142,41.952 49.699,41.952 50.927,43.18 50.927,44.958 54.483,48.514 58.42,48.514 59.206,47.728 J4.6@59.206,47.53
P4_TX1_N: C45.2 J4.8 | length 4.8
  Top Layer 1 w0.128: C45.2@55.106,43.307 55.121,43.307 55.527,42.901 55.527,42.886 55.68,42.733 55.821,42.592 57.162,42.592 57.21,42.64 58.316,42.64 J4.8@59.206,43.53
P4_TX1_P: C47.2 J4.9 | length 4.7
  Top Layer 1 w0.128: C47.2@55.106,41.529 55.121,41.529 55.527,41.935 55.527,41.95 55.754,42.177 58.495,42.177 J4.9@59.206,41.466
P4_TX_N: C45.1 U7.29 | length 21.2
  Top Layer 1 w0.128: U7.29@38.509,37.063 38.509,36.97 38.767,36.712 38.767,36.697 40.286,35.179 46.261,35.179 47.277,36.195 47.277,39.387 49.132,41.242 50.712,41.242 52.162,42.692 52.976,42.692 53.185,42.901 53.591,43.307 C45.1@53.606,43.307
P4_TX_P: C47.1 U7.28 | length 21.4
  Top Layer 1 w0.128: U7.28@38.155,36.709 38.249,36.709 38.507,36.451 38.521,36.451 40.141,34.831 46.405,34.831 47.625,36.051 47.625,39.243 49.276,40.894 50.857,40.894 52.154,42.192 52.928,42.192 53.185,41.935 53.591,41.529 C47.1@53.606,41.529
PWR1: C19.2 C25.2 J1.1 pad.3@3.307,55.967 pad.3@5.212,55.967 U3.1 | length 9.4
  Bottom Layer w0.254: pad.3@5.212,55.967 7.152,55.967 7.366,55.753 7.366,52.832 6.7,52.166 6.7,49.507 J1.1@6.223,49.03
PWR2: C20.2 C26.2 J2.1 pad.3@3.053,26.757 U4.1 | length 11.5
  Bottom Layer w0.254: pad.3@3.053,26.757 6.898,26.757 7.239,26.416 7.239,22.098 6.223,21.082 J2.1@6.223,19.629
PWR3: C21.2 C27.2 J3.1 pad.3@66.172,6.564 U6.1 | length 13.5
  Bottom Layer w0.254: J3.1@60.706,12.629 60.706,10.922 59.563,9.779 59.563,6.858 60.452,5.969 65.577,5.969 pad.3@66.172,6.564
PWR4: C22.2 C28.2 J4.1 pad.3@60.711,36.155 pad.3@65.918,36.155 U5.1
UP_TX_N: C33.2 U7.56 | length 27.9
  Top Layer 1 w0.128: U7.56@30.823,41.921 30.823,42.014 30.565,42.272 30.565,42.286 30.236,42.615 30.236,42.633 28.481,44.388 28.481,50.656 27.94,51.197 27.94,53.975 29.591,55.626 35.941,55.626 38.608,58.293 38.608,59.182 38.227,59.563 38.224,59.563 37.719,60.068 C33.2@37.719,60.083
UP_TX_P: C34.2 U7.55 | length 27.5
  Top Layer 1 w0.128: U7.55@31.176,42.274 31.083,42.274 30.825,42.532 30.811,42.532 30.584,42.759 30.584,42.777 28.829,44.532 28.829,50.8 28.288,51.341 28.288,53.831 29.735,55.278 36.085,55.278 38.989,58.182 38.989,59.309 39.218,59.538 39.218,59.677 C34.2@39.624,60.083
USB2UP_D_N: J0.2 U7.54 | length 39
  Top Layer 1 w0.128: v1(29.058,52.172) 29.134,52.095 29.421,52.095 29.845,51.672 29.845,44.052 30.748,43.149 31.116,43.149 31.272,42.993 31.272,42.979 31.53,42.721 U7.54@31.53,42.628
  Bottom Layer 1 w0.128: v1(29.058,52.172) 28.981,52.248 28.981,52.535 27.305,54.212 27.305,63.594 28.989,65.278 28.989,66.667 31.247,68.925 31.247,69.966 32.368,71.087 34.434,71.087 36.115,69.406 36.115,68.353 36.19,68.278 J0.2@36.941,68.278
USB2UP_D_P: J0.3 U7.53 | length 37.6
  Top Layer 1 w0.128: v1(29.591,52.705) 29.667,52.629 29.667,52.342 30.193,51.816 30.193,44.196 30.892,43.497 31.26,43.497 31.518,43.24 31.532,43.24 31.79,42.981 U7.53@31.883,42.981
  Bottom Layer 1 w0.128: v1(29.591,52.705) 29.515,52.781 29.228,52.781 27.653,54.356 27.653,63.45 29.337,65.134 29.337,66.523 31.595,68.781 31.595,69.822 32.512,70.739 34.29,70.739 35.767,69.262 35.767,68.353 35.692,68.278 J0.3@34.941,68.278
USB3UP_RX_N: J0.5 U7.58 | length 45.5
  Top Layer 1 w0.128: v1(26.416,56.388) 26.416,56.28 26.213,56.077 26.213,49.733 27.813,48.133 27.813,43.409 29.75,41.472 29.764,41.472 30.022,41.214 U7.58@30.116,41.214 ; v1(30.607,72.771) 30.715,72.771 30.918,72.974 31.137,72.974 33.263,70.848 33.263,67.937 32.104,66.778 J0.5@31.941,66.778
  Bottom Layer 1 w0.128: v1(26.416,56.388) 26.416,56.496 26.213,56.699 26.213,71.425 27.762,72.974 30.296,72.974 30.499,72.771 v1(30.607,72.771)
USB3UP_RX_P: J0.6 U7.59 | length 46.4
  Top Layer 1 w0.128: v1(25.662,56.388) 25.662,56.28 25.865,56.077 25.865,49.589 27.465,47.989 27.465,43.265 29.504,41.226 29.504,41.212 29.762,40.953 U7.59@29.762,40.86 ; v1(30.607,73.525) 30.715,73.525 30.918,73.322 31.281,73.322 33.611,70.992 33.611,67.393 33.941,67.063 J0.6@33.941,66.778
  Bottom Layer 1 w0.128: v1(25.662,56.388) 25.662,56.496 25.865,56.699 25.865,71.569 27.618,73.322 30.296,73.322 30.499,73.525 v1(30.607,73.525)
USB3UP_TX_N: C33.1 J0.8 | length 6
  Top Layer 1 w0.128: C33.1@37.719,61.583 37.719,61.598 38.125,62.004 38.14,62.004 38.497,62.361 38.497,64.127 38.767,64.396 38.767,65.952 J0.8@37.941,66.778
USB3UP_TX_P: C34.1 J0.9 | length 6
  Top Layer 1 w0.128: C34.1@39.624,61.583 39.624,61.598 39.218,62.004 39.203,62.004 38.846,62.361 38.846,63.983 39.115,64.252 39.115,65.952 J0.9@39.941,66.778
VBUS_5V: D1.A J0.1
VBUS_5V0: C3.2 C5.2 C31.2 D1.C P1.1 pad.3@50.419,71.628 pad.3@50.497,69.778 pad.3@52.082,51.055 R4.1 R7.1 U1.3 U2.3 | length 75.1
  Bottom Layer w0.254: P1.1@22.987,71.628 25.495,71.628 30.448,76.581 40.894,76.581 41.021,76.454 43.942,76.454 45.213,77.725 57.784,77.725 61.553,73.956 61.553,73.745 60.198,72.39 60.198,72.263 56.769,68.834 51.442,68.834 ; pad.3@50.497,69.778 51.442,68.834 ; pad.3@52.082,51.055 52.082,65.671 52.705,66.294 52.705,67.571 51.442,68.834
pads on no net: U1.4 U3.3 U4.3 U5.3 U6.3 U7.42 U7.43 U7.46 U7.47

## Polygon pours and split planes (outlines as drawn)
GND on Top Layer 1 "NONET_L-01_P-001" (solid, remove dead copper, pour order 0): 68.199,80.772 68.199,-0.254 0,-0.254 -0.127,-0.127 -0.127,80.772
GND on Bottom Layer 1 "NONET_L-01_P-001" (solid, remove dead copper, pour order 1): 68.58,80.645 68.58,0 0,0 0,80.645
GND on Top Layer "NONET_L-01_P-001" (solid, remove dead copper, pour order 3): 0,80.645 68.199,80.645 68.199,0 0,0
EXT_5V0 on Bottom Layer "NONET_L-01_P-001" (solid, remove dead copper, pour order 5): 68.199,80.645 68.199,0 0,0 0,80.645

## Keep-outs
Keep-Out Layer:
  the board outline again, w0.254

## Other copper
Top Layer 1:
  region net 3V3: 19.812,10.795 25.654,10.795 25.654,7.874 19.812,7.874
  region net VBUS_5V0: 50.673,52.959 50.673,50.292 52.959,50.292 52.959,52.959
  region net 3V3: 57.785,59.944 57.785,57.404 58.801,57.404 58.801,59.944
  region net VBUS_5V0: 19.685,62.611 19.685,64.262 21.971,64.262 21.971,70.485 23.622,70.485 23.622,62.992 22.733,62.992 22.352,62.611
  region net PWR4: 59.944,33.401 59.944,36.957 66.421,36.957 66.548,36.83 66.548,34.29 63.5,34.29 63.246,34.036 61.468,34.036 61.468,33.528 61.341,33.401
  region net PWR3: 61.087,7.239 61.087,5.334 61.214,5.207 63.373,5.207 63.627,5.461 63.627,7.239
  region net PWR3: 60.325,7.239 66.929,7.239 67.056,7.112 67.056,5.969 61.087,5.969 61.087,6.477 60.325,6.477
  region net EXT_5V0: 6.35,29.845 6.35,32.258 7.366,32.258 7.366,29.845
  region net PWR2: 7.366,28.194 6.731,28.194 5.969,28.956 1.524,28.956 1.524,26.289 1.905,25.908 7.366,25.908
  region net EXT_5V0: 6.223,59.182 6.223,61.468 7.239,61.468 7.239,59.182
  region net PWR1: 6.604,57.531 5.969,58.166 2.032,58.166 2.032,55.753 2.413,55.372 7.239,55.372 7.239,57.531
  region net 3V3: 39.57,39.092 39.57,39.189 39.878,39.497 40.894,39.497 41.148,39.243 41.148,38.862 40.767,38.481 40.005,38.481 39.624,38.862 39.497,38.735 39.306,38.925 39.579,39.198 39.676,39.198
  region net 1V2: 33.909,32.766 33.909,31.623 33.718,31.432 34.608,30.543 35.433,31.369 35.433,31.496 34.036,32.893
  region net EXT_5V0: 60.325,4.953 60.325,4.191 59.817,3.683 59.817,2.54 61.087,2.54 61.087,3.81 60.706,4.191 60.706,4.953
  region net 3V3: 28.344,39.446 28.348,39.597 27.432,40.513 25.527,40.513 25.146,40.132 25.146,39.37 25.527,38.989 26.416,38.989 27.178,39.751 28.039,39.751
  region net EXT_5V0: 59.944,31.877 59.944,31.242 59.69,30.988 59.69,29.972 60.96,29.972 60.96,30.988 60.452,31.496 60.452,31.877
  region net GND: 23.73,44.958 20.066,44.958 20.066,48.26 24.384,48.26 24.384,46.736 23.73,46.736 23.73,45.105
  region net GND: 48.895,64.77 48.895,64.262 46.609,64.262 46.609,59.309 52.578,59.309 52.578,64.77
  region net GND: 51.308,75.819 47.752,75.819 47.752,79.756 63.246,79.756 63.246,76.073 56.896,76.073 56.896,78.486 51.308,78.486
  region net GND: 56.896,65.659 62.357,65.659 62.357,68.961 56.896,68.961
  region net VBUS_5V: 40.259,67.691 40.259,72.39 40.64,72.771 44.958,72.771 45.72,72.009 45.72,69.469 48.26,69.469 48.26,73.66 47.752,74.168 39.243,74.168 38.735,73.66 38.735,67.691
  region net 3V3: 54.356,68.58 54.356,65.024 53.086,65.024 53.086,59.309 62.357,59.309 62.357,64.77 56.515,64.77 56.515,68.58
  region net 1V2: 54.737,77.978 54.737,72.009 61.976,72.009 61.976,75.311 56.515,75.311 56.515,77.978
  region net VBUS_5V0: 48.895,75.057 48.895,68.072 45.466,68.072 45.466,64.643 48.26,64.643 48.26,65.532 53.848,65.532 53.848,68.58 52.07,68.58 51.689,68.961 51.689,75.057
  region net VBUS_5V0: 51.943,77.978 51.943,75.057 48.895,75.057 48.895,72.39 54.229,72.39 54.229,77.978
  region net VBUS_5V0: 21.971,65.278 21.971,73.025 24.13,73.025 24.13,70.231 22.987,69.088 22.987,65.278
  region net EXT_5V0: 19.304,72.898 19.304,65.278 21.463,65.278 21.463,72.898
  region net EXT_5V0: 8.763,70.104 13.462,70.104 16.51,67.056 21.209,67.056 21.463,66.802 21.463,65.278 7.874,65.278 7.874,69.215
  text "VIETTIEN" at 19.686,14.225 h1.52 r45
Top Layer:
  text "VIETTIEN" at 19.051,21.463 h1.52
Bottom Layer:
  region net VBUS_5V0: 21.844,73.279 26.289,73.279 30.353,77.343 42.799,77.343 43.688,78.232 58.674,78.232 61.849,75.057 61.849,72.517 55.88,66.548 53.34,66.548 53.34,50.292 52.705,49.657 51.435,49.657 50.419,50.673 50.419,57.658 51.816,59.055 51.816,62.23 48.641,65.405 48.641,72.771 49.403,73.533 53.721,73.533 53.721,71.501 59.055,71.501 59.055,75.946 57.658,77.343 45.974,77.343 44.45,75.819 30.861,75.819 25.4,70.358 21.844,70.358
  region net PWR4: 60.071,37.211 61.468,37.211 61.976,36.703 66.167,36.703 66.675,36.195 66.675,34.798 66.421,34.544 59.563,34.544 59.309,34.798 59.309,40.132 60.071,40.894
  region net PWR4: 60.071,35.179 60.452,34.798 61.849,34.798 62.23,35.179 62.23,36.449 60.706,37.973 60.706,40.005 61.468,40.767 61.468,42.799 60.071,42.799
  region net 3V3: 33.909,28.702 22.987,28.702 22.86,28.575 22.86,26.289 25.527,26.289 26.416,27.178 34.798,27.178 44.132,36.512 42.926,37.719
  region net PWR3: 61.341,13.335 60.071,13.335 60.071,11.303 58.674,9.906 58.674,5.461 59.436,4.699 66.167,4.699 67.056,5.588 67.056,8.636 65.278,6.858 60.706,6.858 60.071,7.493 60.071,9.906 61.341,11.176
  region net PWR2: 2.54,27.305 8.255,27.305 8.255,22.733 6.858,21.336 6.858,18.923 5.588,18.923 5.588,20.955 6.604,21.971 6.604,24.765 5.461,25.908 2.54,25.908
  region net PWR1: 2.54,56.642 8.509,56.642 8.636,56.515 8.636,52.197 6.858,50.419 6.858,48.387 5.461,48.387 5.461,50.546 6.477,51.562 6.477,54.864 2.54,54.864
  region net 1V2: 58.674,71.755 58.674,75.692 45.466,75.692 44.958,75.184 44.958,66.294 43.561,64.897 37.846,64.897 35.56,62.611 35.56,43.815 38.354,43.815 38.354,61.976 38.989,62.611 45.593,62.611 48.133,65.151 48.133,73.152 48.895,73.914 54.229,73.914 54.229,71.755
  region net 3V3: 53.975,66.167 53.975,41.783 50.419,38.227 41.91,38.227 41.91,35.687 42.037,35.56 52.324,35.56 56.896,40.132 56.896,60.706 58.547,62.357 58.547,66.167
  region net 3V3: 34.925,32.512 34.925,32.385 36.957,30.353 37.973,30.353 43.307,35.687 43.307,38.862 41.465,40.703 40.005,39.243 40.005,37.846 41.275,36.576 37.465,32.766 36.83,32.766 36.195,33.401 35.814,33.401
  region net 3V3: 29.591,46.609 28.194,46.609 19.812,38.227 19.812,8.001 26.416,8.001 26.416,41.021 29.527,44.132 31.051,42.608 32.321,43.878
  region net 1V2: 39.243,36.576 38.481,37.338 38.481,41.402 39.116,42.037 40.386,40.767 40.386,40.132 39.624,39.37 39.624,37.719 40.64,36.703 39.878,35.941
  region net 1V2: 29.464,43.688 26.924,41.148 26.924,34.29 27.94,34.29 30.226,36.576 28.956,37.846 28.956,38.862 29.337,39.243 29.337,41.021 30.734,42.418
  region net 1V2: 35.56,34.417 36.703,33.274 36.957,33.274 37.846,34.163 37.846,34.417 36.703,35.56
  region net 1V2: 39.116,38.227 32.893,32.004 34.417,30.48 35.306,31.369 35.306,31.496 34.417,32.385 36.005,33.972 36.957,33.02 40.64,36.703
  region net 1V2: 30.607,45.974 32.512,44.069 35.306,44.069 39.814,39.56 41.212,40.957 36.322,45.847 32.512,45.847 31.496,46.863
  region net 1V2: 26.924,34.544 26.924,34.036 31.877,29.083 33.655,29.083 35.687,31.115 29.591,37.211
  text "VIETTIEN" at 13.971,39.371 h1.52 r45
Bottom Layer 1:
  region net EXT_5V0: 59.69,29.972 62.484,29.972 62.484,32.385 59.69,32.385
  region net EXT_5V0: 59.76,5.484 59.76,2.69 61.411,2.69 61.411,5.484
  region net EXT_5V0: 6.223,32.154 6.223,29.36 8.001,29.36 8.001,32.154
  region net EXT_5V0: 6.35,61.468 6.35,58.674 8.001,58.674 8.001,61.468
  region net 1V2: 40.608,42.45 38.767,40.608 39.719,39.656 41.561,41.497
  region net 3V3: 41.91,41.148 39.878,39.116 40.767,38.227 42.799,40.259
  region net 1V2: 38.735,36.703 40.767,34.671 42.037,35.941 40.005,37.973
  region net 1V2: 37.274,34.988 36.322,34.036 38.1,32.258 39.052,33.21
  region net 1V2: 34.48,32.194 33.528,31.242 35.306,29.464 36.068,30.226 36.068,30.607
  region net 3V3: 35.496,33.21 37.274,31.432 36.449,30.607 34.671,32.385
  region net 1V2: 31.369,33.909 29.654,32.194 30.797,31.051 32.512,32.766
  region net 1V2: 28.892,36.386 26.987,34.48 27.94,33.528 29.845,35.433
  region net 3V3: 23.939,40.576 25.654,38.862 26.797,40.005 25.082,41.719
  region net 1V2: 30.797,46.038 32.385,47.625 33.274,46.736 31.686,45.148
  region net 3V3: 29.591,45.085 31.369,43.307 32.258,44.196 30.48,45.974
  region net 1V2: 27.813,43.307 29.591,41.529 30.607,42.545 28.829,44.323

## Silkscreen, mask and mechanical layers (free items; w line width, h text height)
Top Overlay:
  text "POWER SUPPLY 5V" at 6.35,65.162 h1
  text "USB3.0" at 42.291,15.13 h1.52
  text "USB2.0" at 21.278,7.578 h1.52
Bottom Overlay:
  text "IN" at 37.084,74.295 h1.52
  text "OUT" at 66.013,48.367 h1.52 r90
  text "OUT" at 3.148,48.006 h1.52 r90
  text "OUT" at 3.148,19.411 h1.52 r90
  text "OUT" at 66.013,18.141 h1.52 r90